# Altium PCB PCBTDA1.PcbDoc
Units mm, origin at the board's own origin, x right, y up, seen from the top; angles counter-clockwise.
Board outline 149.1 x 60.3 mm, 2 copper layers (Top Layer, Bottom Layer), stack 1.571 mm thick; 23 components, 18 nets, 67 pads, 12 vias.
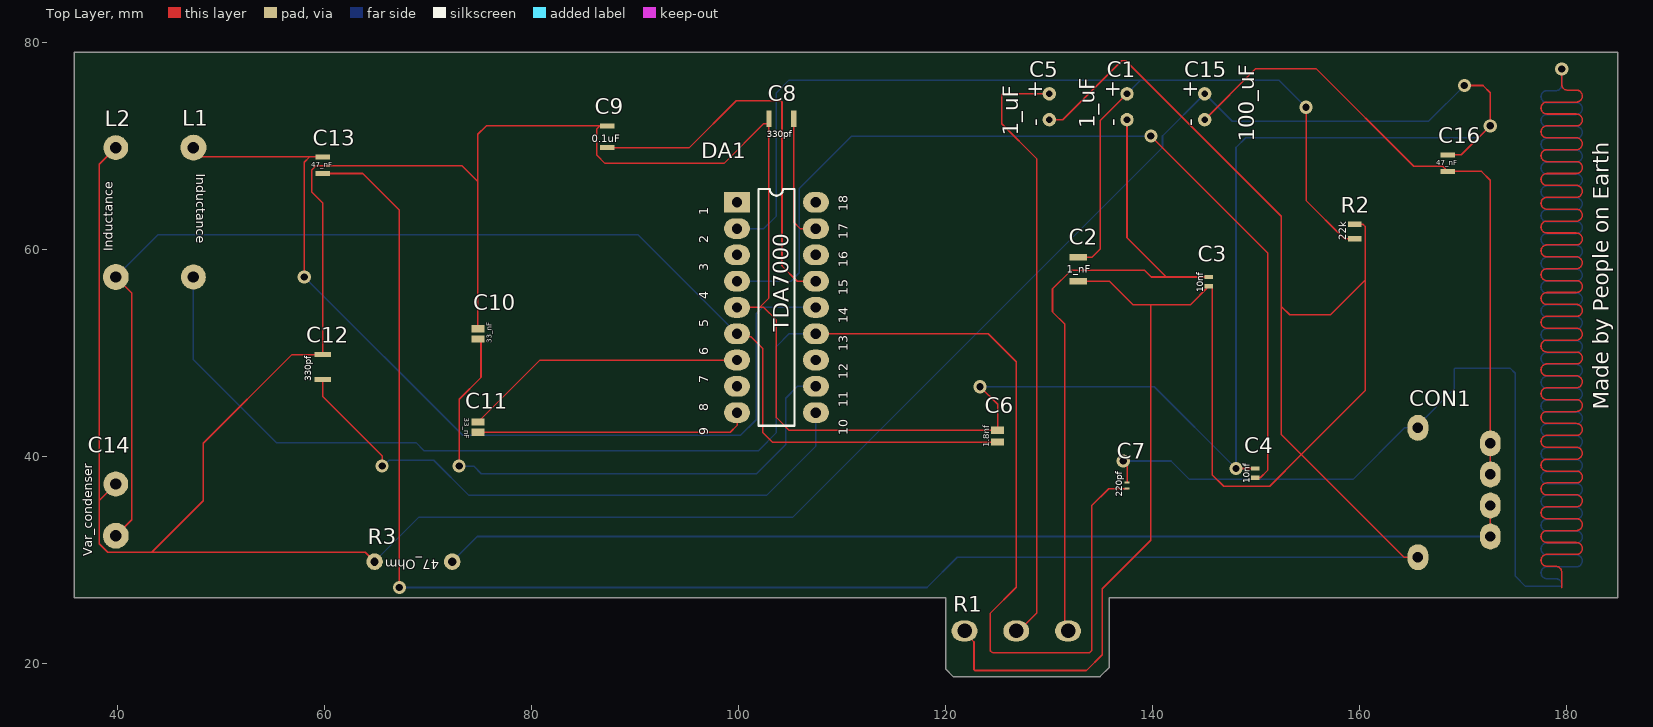
[diagram p0: Top Layer view]
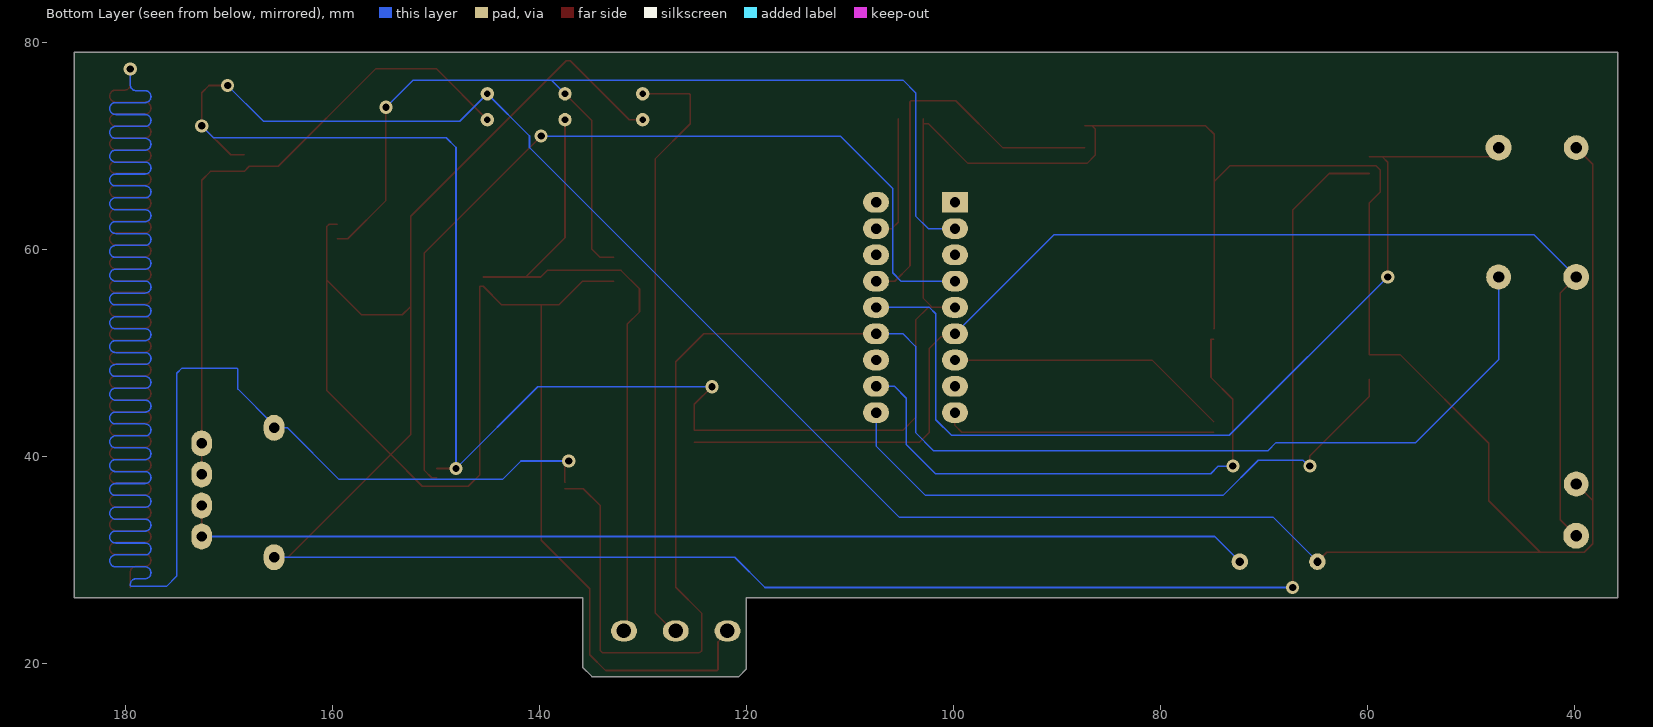
[diagram p1: Bottom Layer view, seen from below]

## Layer stack, top to bottom
Top Solder: solder mask 0.0102, Solder Resist, Dk 3.5
Top Layer: signal copper 0.0356
Dielectric 1: dielectric 1.5, FR-4, Dk 4.8
Bottom Layer: signal copper 0.0356
Bottom Solder: solder mask 0.0102, Solder Resist, Dk 3.5

## Board outline
120,26.3 120,19.4 120.7,18.7 134.9,18.7 135.8,19.6 135.8,26.3 184.9,26.3 184.9,79 35.8,79 35.8,26.3

## Design rules (kind name [scope] priority, off if disabled: settings)
Clearance [All] p1: gap=0.254 ignorepadtopadclearanceinfootprint=FALSE
DiffPairsRouting [All] p1: maxlimit=0.41 minlimit=0.254 mostfreqgap=0.4 toplayer_minwidth=0.41 toplayer_maxwidth=0.41 toplayer_prefwidth=0.41 bottomlayer_minwidth=0.41 bottomlayer_maxwidth=0.41 bottomlayer_prefwidth=0.41 maxuncoupledlength=12.7
PolygonConnect [All] p1: connectstyle=Relief reliefconductorwidth=0.254 reliefentries=4 polygonreliefangle="90 Angle" airgapwidth=0.254
RoutingTopology [All] p1: topology=Daisy_Simple
RoutingVias [All] p1: holewidth=0.711 width=1.27 viastyle="Through Hole" minholewidth=0.711 minwidth=1.27 maxholewidth=0.711 maxwidth=1.27
SolderMaskExpansion [All] p1: expansion=0.102 istentingtop=FALSE
SupplyNets "Schematic Supply Nets" [InNet('GND')] p1: voltage=0.000
Width [All] p1: maxlimit=0.15 minlimit=0.15 preferedwidth=0.15
28 further rules are at their usual default settings.

## Components (designator, comment, footprint, x,y, rotation, side; value= is the part's Value field where it differs from the comment)
C1 "Cp" "100uF (polar)" 137.5,72.5 r90 top
C2 "Capacitor" 1nf 132.8,59.2 r0 top
C3 "Capacitor" 10nf 145.4,57.3 r0 top
C4 "Capacitor" 10nf 149.9,38.8 r0 top
C5 "Cp" "100uF (polar)" 130,72.5 r90 top
C6 "Capacitor" 1.8nf 125,42.5 r0 top
C7 "Capacitor" 220pf 137.5,37.5 r0 top
C8 "Capacitor" 330pf 102.9,72.6 r90 top
C9 "Capacitor" 0.1uF 87.3,71.9 r0 top
C10 "Capacitor" 33nf 74.8,52.3 r0 top
C11 "Capacitor" 33nf 74.8,42.3 r180 top
C12 "Capacitor" 330pf 59.8,49.8 r0 top
C13 "Capacitor" 47nf 59.8,68.9 r0 top
C14 "CV" ANY_Condenser 39.8,32.3 r90 top
C15 "Cp" "100uF (polar)" 145,72.5 r90 top
C16 "Capacitor" 47nf 168.5,69.1 r0 top
CON1 "contacts_for_tda7000" connector 165.608,30.226 r180 top
DA1 "TDA7000" DIP18 99.822,64.516 r0 top
L1 "Inductor" ANY_INDUCTOR 47.3,62.3 r270 top
L2 "Inductor" ANY_INDUCTOR 39.8,64.8 r90 top
R1 "RV" RV 126.8,23.1 r180 top
R2 "R_for_TDA" 22K 159.5,62.4 r0 top
R3 "R_for_TDA" "47 ohms" 72.3,29.8 r180 top

## Footprints (in the part's own frame and the unit in brackets; to place one, negate y for a bottom-side part, rotate by r counter-clockwise, add the part's x,y. Pads: shape width x height; smd on the part's side, far side on the other; paste and mask are expansions set on the pad)
0.1uF [mm]
  rect 1.4x0.5 smd: 1(0,0) 2(0,-2.1)
1.8nf [mm]
  rect 1.25x0.7 smd: 1(0,0) 2(0,-1.15)
1nf [mm]
  rect 1.7x0.65 smd: 1(0,0) 2(0,-2.3)
10nf [mm]
  rect 0.8x0.4 smd: 1(0,0) 2(0,-0.9)
22K [mm]
  rect 1.3x0.5 smd: 1(0,0) 2(0,-1.4)
33nf [mm]
  rect 1.25x0.7 smd: 1(0,0) 2(0,-1)
"47 ohms" [mm]
  round 1.6 hole 0.8: 1(0,0) 2(7.5,0)
47nf [mm]
  rect 1.4x0.5 smd: 1(0,0) 2(0,-1.6)
"100uF (polar)" [mm]
  round 1.3 hole 0.65: 1(0,0) 2(2.5,0)
220pf [mm]
  rect 0.5x0.2 smd: 1(0,-0.05) 2(0,-0.65)
330pf [mm]
  rect 1.6x0.5 smd: 1(0,0) 2(0,-2.4)
ANY_Condenser [mm] "For different conditions"
  round 2.5 hole 1.1: 1(0,0)
  round 2.4 hole 1.1: 2(5,0)
ANY_INDUCTOR [mm]
  round 2.5 hole 1.1: 1(-7.5,0)
  round 2.4 hole 1.1: 2(5,0)
connector [mm]
  oval 2x2.5 hole 1: 1(0,0) 2(0,-12.5) 3(-7,-2) 4(-7,-5) 5(-7,-8) 6(-7,-11)
DIP18 [mm]
  rect 2.5x2 hole 1: 1(0,0)
  oval 2.5x2 hole 1: 2(0,-2.54) 3(0,-5.08) 4(0,-7.62) 5(0,-10.16) 6(0,-12.7) 7(0,-15.24) 8(0,-17.78) 9(0,-20.32) 10(7.62,-20.32) 11(7.62,-17.78) 12(7.62,-15.24) 13(7.62,-12.7) 14(7.62,-10.16) 15(7.62,-7.62) 16(7.62,-5.08) 17(7.62,-2.54) 18(7.62,0)
  silkscreen extent 2.08,-21.59 5.54,1.27, body extent -0.38,-21.16 7.99,0.84, height 4.45
RV [mm]
  oval 2.5x2 hole 1.4: 1(-5,0) 2(5,0) 3(0,0)

## Via types
v1: diameter 1.27, hole 0.711, Top Layer to Bottom Layer, 12 vias

## Nets (pads, with @x,y where several pads share a name; then routed paths per layer and width w, separated by ;. In a path a pad name is that pad's centre, name@x,y a point inside that pad or via, vN(x,y) a via of type N, cw(c..) or ccw(c..) an arc to the next point about the centre after c; other vN are vias at no path point)
GND: C15.1 C16.2 CON1.5 CON1.6 | length 62.5
  Top Layer w0.15: C15.1 149.9,77.4 155.8,77.4 165.2,68 168,68 C16.2 171.758,67.5 172.608,66.65 CON1.6 CON1.5
NetC1_1: C1.1 C3.1 R1.1 | length 66.6
  Top Layer w0.15: R1.1 131.5,23.4 131.5,52.726 130.3,53.926 130.3,56.157 132.08,57.937 139.215,57.937 139.852,57.3 141.303,57.3 ; C1.1 137.5,61.103 141.303,57.3 ; C3.1 141.303,57.3
NetC1_2: C1.2 C2.1 DA1.2 R2.2 | length 104.6
  Top Layer w0.15: C2.1 134.112,59.2 134.925,60.013 134.925,72.425 C1.2 ; v1(154.8,73.7) 154.8,64.696 158.496,61 R2.2
  Bottom Layer w0.15: DA1.2 102.413,61.976 103.632,63.195 103.632,75.108 104.851,76.327 138.827,76.327 ; C1.2 138.827,76.327 ; v1(154.8,73.7) 152.173,76.327 138.827,76.327
NetC2_2: C2.2 C3.2 C5.1 C13.2 CON1.1 R1.2 R2.1 | length 346.7
  Top Layer w0.15: C13.2 63.652,67.3 67.2,63.752 v1(67.2,27.3) ; R1.2 121.8,22.954 122.718,22.036 122.718,19.37 122.806,19.282 133.582,19.282 135.1,20.8 135.1,27.175 139.8,31.875 139.8,54.6 ; C5.1 131.3,72.5 137,78.2 137.37,78.2 152.4,63.17 152.4,54.458 ; C2.2 135.8,56.9 138.1,54.6 139.8,54.6 ; R2.1 160.282,62.4 160.503,62.179 160.503,56.998 ; CON1.1 164.262,30.226 154.343,40.145 ; 139.8,54.6 143.6,54.6 C3.2 145.72,56.4 145.72,38.202 146.837,37.084 151.282,37.084 154.343,40.145 ; 152.4,54.458 152.4,42.088 154.343,40.145 ; 152.4,54.458 153.213,53.645 157.15,53.645 160.503,56.998 ; 154.343,40.145 160.503,46.304 160.503,56.998
  Bottom Layer w0.15: v1(67.2,27.3) 118.181,27.3 121.107,30.226 CON1.1
NetC4_1: C4.1 C6.1 C8.1 C9.1 C10.1 C12.1 C14.2 C15.2 C16.1 DA1.5 L2.2 R3.2 | length 468.4
  Top Layer w0.15: C14.2 38.202,35.702 ; L2.2 38.202,68.202 38.202,35.702 ; C12.1 C12.1@59.792,49.8 ; R3.2 63.891,30.709 43.282,30.709 ; C10.1 74.778,52.3 74.778,66.523 ; C9.1 86.563,71.9 ; DA1.5 101.986,54.356 ; C8.1 C8.1@102.9,72.111 ; v1(123.3,46.7) 125,45 C6.1 104.851,42.5 103.632,43.719 103.632,53.137 102.413,54.356 101.986,54.356 ; v1(148.031,38.8) C4.1 ; C16.1 169.8,69.1 v1(172.6,71.9) 172.6,75.1 171.9,75.8 v1(170.1,75.8) ; 38.202,35.702 38.202,31.521 39.014,30.709 43.282,30.709 ; 43.282,30.709 48.26,35.687 48.26,41.24 56.82,49.8 C12.1@59.792,49.8 ; C12.1@59.792,49.8 59.792,64.44 58.75,65.481 58.75,67.666 59.131,68.047 73.254,68.047 74.778,66.523 ; 74.778,66.523 74.778,71.087 75.59,71.9 86.563,71.9 ; 86.563,71.9 86.258,71.595 86.258,69.088 87.071,68.275 98.552,68.275 102.387,72.111 C8.1@102.9,72.111 ; 101.986,54.356 102.9,55.27 C8.1@102.9,72.111
  Bottom Layer w0.15: R3.2 69.1,34.1 105.218,34.1 140.928,69.81 140.928,70.928 C15.2 147.661,72.339 166.639,72.339 v1(170.1,75.8) ; v1(123.3,46.7) 140.131,46.7 v1(148.031,38.8) 148.031,69.813 148.968,70.749 171.449,70.749 v1(172.6,71.9)
NetC4_2: C4.2 DA1.4 | length 89
  Top Layer w0.15: v1(139.802,70.917) 151.079,59.639 151.079,38.608 150.371,37.9 C4.2
  Bottom Layer w0.15: DA1.4 105.029,56.896 105.842,57.709 105.842,65.862 110.896,70.917 v1(139.802,70.917)
NetC5_2: C5.2 R1.3 | length 58.8
  Top Layer w0.15: R1.3 127.05,23.1 128.8,24.85 128.8,68.7 125.4,72.1 125.4,74.912 125.488,75 C5.2
NetC6_2: C6.2 C14.1 DA1.6 L2.1 | length 126.2
  Top Layer w0.15: C14.1 41.351,33.851 41.351,55.749 L2.1 ; DA1.6 100.132,51.506 101.194,51.506 102.311,50.389 102.311,42.264 103.226,41.35 C6.2
  Bottom Layer w0.15: L2.1 43.9,61.4 90.238,61.4 DA1.6
NetC7_1: C7.1 CON1.2 | length 454.4
  Top Layer w0.15: v1(137.135,39.522) 137.516,39.141 137.516,37.45 C7.1 ; 179.5,27.3 179.5,28.7 179.5,28.775 ccw(c178.925,28.775) 178.925,29.35 178.075,29.35 cw(c178.075,29.925) 178.075,30.5 180.925,30.5 ccw(c180.925,31.075) 180.925,31.65 178.075,31.65 cw(c178.075,32.225) 178.075,32.8 180.925,32.8 ccw(c180.925,33.375) 180.925,33.95 178.075,33.95 cw(c178.075,34.525) 178.075,35.1 180.925,35.1 ccw(c180.925,35.675) 180.925,36.25 178.075,36.25 cw(c178.075,36.825) 178.075,37.4 180.925,37.4 ccw(c180.925,37.975) 180.925,38.55 178.075,38.55 cw(c178.075,39.125) 178.075,39.7 180.925,39.7 ccw(c180.925,40.275) 180.925,40.85 178.075,40.85 cw(c178.075,41.425) 178.075,42 180.925,42 ccw(c180.925,42.575) 180.925,43.15 178.075,43.15 cw(c178.075,43.725) 178.075,44.3 180.925,44.3 ccw(c180.925,44.875) 180.925,45.45 178.075,45.45 cw(c178.075,46.025) 178.075,46.6 180.925,46.6 ccw(c180.925,47.175) 180.925,47.75 178.075,47.75 cw(c178.075,48.325) 178.075,48.9 180.925,48.9 ccw(c180.925,49.475) 180.925,50.05 178.075,50.05 cw(c178.075,50.625) 178.075,51.2 180.925,51.2 ccw(c180.925,51.775) 180.925,52.35 178.075,52.35 cw(c178.075,52.925) 178.075,53.5 180.925,53.5 ccw(c180.925,54.075) 180.925,54.65 178.075,54.65 cw(c178.075,55.225) 178.075,55.8 180.925,55.8 ccw(c180.925,56.375) 180.925,56.95 178.075,56.95 cw(c178.075,57.525) 178.075,58.1 180.925,58.1 ccw(c180.925,58.675) 180.925,59.25 178.075,59.25 cw(c178.075,59.825) 178.075,60.4 180.925,60.4 ccw(c180.925,60.975) 180.925,61.55 178.075,61.55 cw(c178.075,62.125) 178.075,62.7 180.925,62.7 ccw(c180.925,63.275) 180.925,63.85 178.075,63.85 cw(c178.075,64.425) 178.075,65 180.925,65 ccw(c180.925,65.575) 180.925,66.15 178.075,66.15 cw(c178.075,66.725) 178.075,67.3 180.925,67.3 ccw(c180.925,67.875) 180.925,68.45 178.075,68.45 cw(c178.075,69.025) 178.075,69.6 180.925,69.6 ccw(c180.925,70.175) 180.925,70.75 178.075,70.75 cw(c178.075,71.325) 178.075,71.9 180.925,71.9 ccw(c180.925,72.475) 180.925,73.05 178.075,73.05 cw(c178.075,73.625) 178.075,74.2 180.925,74.2 ccw(c180.925,74.775) 180.925,75.35 180.075,75.35 cw(c180.075,75.925) 179.5,75.925 v1(179.5,77.4)
  Bottom Layer w0.15: v1(137.135,39.522) 141.757,39.522 143.535,37.744 159.331,37.744 164.313,42.726 CON1.2 165.608,42.976 169.1,46.468 169.1,48.412 169.188,48.5 174.5,48.5 175,48 175,28.4 176,27.4 179.412,27.4 179.5,27.488 179.5,27.5 179.5,27.575 ccw(c178.925,27.575) 178.925,28.15 178.075,28.15 cw(c178.075,28.725) 178.075,29.3 180.925,29.3 ccw(c180.925,29.875) 180.925,30.45 178.075,30.45 cw(c178.075,31.025) 178.075,31.6 180.925,31.6 ccw(c180.925,32.175) 180.925,32.75 178.075,32.75 cw(c178.075,33.325) 178.075,33.9 180.925,33.9 ccw(c180.925,34.475) 180.925,35.05 178.075,35.05 cw(c178.075,35.625) 178.075,36.2 180.925,36.2 ccw(c180.925,36.775) 180.925,37.35 178.075,37.35 cw(c178.075,37.925) 178.075,38.5 180.925,38.5 ccw(c180.925,39.075) 180.925,39.65 178.075,39.65 cw(c178.075,40.225) 178.075,40.8 180.925,40.8 ccw(c180.925,41.375) 180.925,41.95 178.075,41.95 cw(c178.075,42.525) 178.075,43.1 180.925,43.1 ccw(c180.925,43.675) 180.925,44.25 178.075,44.25 cw(c178.075,44.825) 178.075,45.4 180.925,45.4 ccw(c180.925,45.975) 180.925,46.55 178.075,46.55 cw(c178.075,47.125) 178.075,47.7 180.925,47.7 ccw(c180.925,48.275) 180.925,48.85 178.075,48.85 cw(c178.075,49.425) 178.075,50 180.925,50 ccw(c180.925,50.575) 180.925,51.15 178.075,51.15 cw(c178.075,51.725) 178.075,52.3 180.925,52.3 ccw(c180.925,52.875) 180.925,53.45 178.075,53.45 cw(c178.075,54.025) 178.075,54.6 180.925,54.6 ccw(c180.925,55.175) 180.925,55.75 178.075,55.75 cw(c178.075,56.325) 178.075,56.9 180.925,56.9 ccw(c180.925,57.475) 180.925,58.05 178.075,58.05 cw(c178.075,58.625) 178.075,59.2 180.925,59.2 ccw(c180.925,59.775) 180.925,60.35 178.075,60.35 cw(c178.075,60.925) 178.075,61.5 180.925,61.5 ccw(c180.925,62.075) 180.925,62.65 178.075,62.65 cw(c178.075,63.225) 178.075,63.8 180.925,63.8 ccw(c180.925,64.375) 180.925,64.95 178.075,64.95 cw(c178.075,65.525) 178.075,66.1 180.925,66.1 ccw(c180.925,66.675) 180.925,67.25 178.075,67.25 cw(c178.075,67.825) 178.075,68.4 180.925,68.4 ccw(c180.925,68.975) 180.925,69.55 178.075,69.55 cw(c178.075,70.125) 178.075,70.7 180.925,70.7 ccw(c180.925,71.275) 180.925,71.85 178.075,71.85 cw(c178.075,72.425) 178.075,73 180.925,73 ccw(c180.925,73.575) 180.925,74.15 178.075,74.15 cw(c178.075,74.725) 178.075,75.3 178.925,75.3 ccw(c178.925,75.875) 179.5,75.875 v1(179.5,77.4)
NetC7_2: C7.2 DA1.13 L1.2 | length 158.8
  Top Layer w0.15: DA1.13 124.084,51.816 126.8,49.1 126.8,27.33 124.3,24.83 124.3,21.223 ccw(c124.45,21.224) 124.339,21.124 ccw(c124.677,21.434) 124.677,20.975 133.853,20.975 134.1,21.222 134.1,35.212 135.738,36.85 C7.2
  Bottom Layer w0.15: L1.2 47.3,49.3 55.3,41.3 68.8,41.3 69.6,40.5 101.866,40.5 103.632,42.266 103.632,50.597 104.851,51.816 DA1.13
NetC8_2: C8.2 DA1.17 | length 12.4
  Top Layer w0.15: C8.2 105.3,62.586 105.91,61.976 DA1.17
NetC9_2: C9.2 DA1.15 | length 38.5
  Top Layer w0.15: C9.2 95.225,69.8 99.746,74.32 104.078,74.32 104.165,74.233 104.165,58.369 105.639,56.896 DA1.15
NetC10_2: C10.2 DA1.11 | length 54.3
  Top Layer w0.15: v1(72.974,39.036) 72.974,45.491 75.082,47.6 75.082,51.3 C10.2
  Bottom Layer w0.15: v1(72.974,39.036) 74.373,39.036 75.109,38.3 101.698,38.3 104.521,41.123 104.521,45.593 105.664,46.736 DA1.11
NetC11_1: C11.1 DA1.9 | length 26.5
  Top Layer w0.15: C11.1 99.162,42.3 99.822,42.96 DA1.9
NetC11_2: C11.2 DA1.7 | length 27.5
  Top Layer w0.15: C11.2 80.776,49.276 DA1.7
NetC12_2: C12.2 DA1.10 | length 59.5
  Top Layer w0.15: C12.2 59.792,47.4 59.792,45.745 65.532,40.005 v1(65.532,39.036)
  Bottom Layer w0.15: v1(65.532,39.036) 65.628,39.036 66.188,39.596 70.53,39.596 73.926,36.2 102.672,36.2 107.442,40.97 DA1.10
NetC13_1: C13.1 DA1.14 L1.1 | length 91.6
  Top Layer w0.15: L1.1 48.2,68.9 58.522,68.9 ; v1(58.014,57.302) 58.014,68.392 58.522,68.9 ; C13.1 58.522,68.9
  Bottom Layer w0.15: v1(58.014,57.302) 73.316,42 100.166,42 101.676,43.51 101.676,53.746 102.286,54.356 DA1.14
NetCON1_3: CON1.3 CON1.4 R3.1 | length 104.3
  Top Layer w0.15: CON1.3 CON1.4
  Bottom Layer w0.15: R3.1 74.726,32.226 CON1.3
pads on no net: DA1.1 DA1.3 DA1.8 DA1.12 DA1.16 DA1.18

## Silkscreen, mask and mechanical layers (free items; w line width, h text height)
Top Overlay:
  text "1_uF" at 134.392,71.654 h1.52 r90
  text "1_uF" at 126.992,70.954 h1.52 r90
  text "100_uF" at 149.792,70.354 h1.52 r90
  text "Made by People on Earth" at 184.038,44.454 h1.52 r90

## Text inside footprints (layer, text, board x,y; h text height)
C1: Top Overlay "-" at 136.808,71.854 h1.52 r90; Top Overlay "+" at 136.8,74.554 h1.52 r90
C2: Top Overlay "1_nF" at 131.7,57.717 h0.7
C3: Top Overlay "10nf" at 144.85,55.85 h0.65 r90
C4: Top Overlay "10nf" at 149.35,37.35 h0.65 r90
C5: Top Overlay "-" at 129.308,71.854 h1.52 r90; Top Overlay "+" at 129.3,74.554 h1.52 r90
C6: Top Overlay "1.8nf" at 124.2,40.85 h0.6 r90
C7: Top Overlay "220pf" at 137.033,36.05 h0.65 r90
C8: Top Overlay "330pf" at 102.7,70.817 h0.65
C9: Top Overlay "0.1uF" at 85.8,70.3 h0.7
C10: Top Overlay "33_nF" at 76.117,50.9 h0.5 r90
C11: Top Overlay "33_nF" at 73.483,43.7 h0.5 r270
C12: Top Overlay "330pf" at 58.683,47.25 h0.65 r90
C13: Top Overlay "47_nF" at 58.7,67.883 h0.5
C14: Top Overlay "Var_condenser" at 37.8,30.3 h1.52 r90
C15: Top Overlay "-" at 144.308,71.854 h1.52 r90; Top Overlay "+" at 144.3,74.554 h1.52 r90
C16: Top Overlay "47_nF" at 167.4,68.083 h0.5
DA1: Top Overlay "10   11   12   13   14   15   16   17   18" at 110.822,42.016 h1.52 r90; Top Overlay "9    8     7     6     5     4     3     2     1" at 97.322,42.016 h1.52 r90
L1: Top Overlay "Inductance" at 47.3,67.3 h1.52 r270
L2: Top Overlay "Inductance" at 39.8,59.8 h1.52 r90
R2: Top Overlay "22k" at 158.7,60.85 h0.7 r90
R3: Top Overlay "47_Ohm" at 71.05,30 h0.9 r180